# Altium PCB Anya_2620_V1_I1.PcbDoc (part 2 of 2)
Units mm, origin at the board's own origin, x right, y up, seen from the top; angles counter-clockwise.
Board outline 70 x 70 mm, 2 copper layers (Top Layer, Bottom Layer), stack 1.671 mm thick; 65 components, 38 nets, 247 pads, 122 vias.
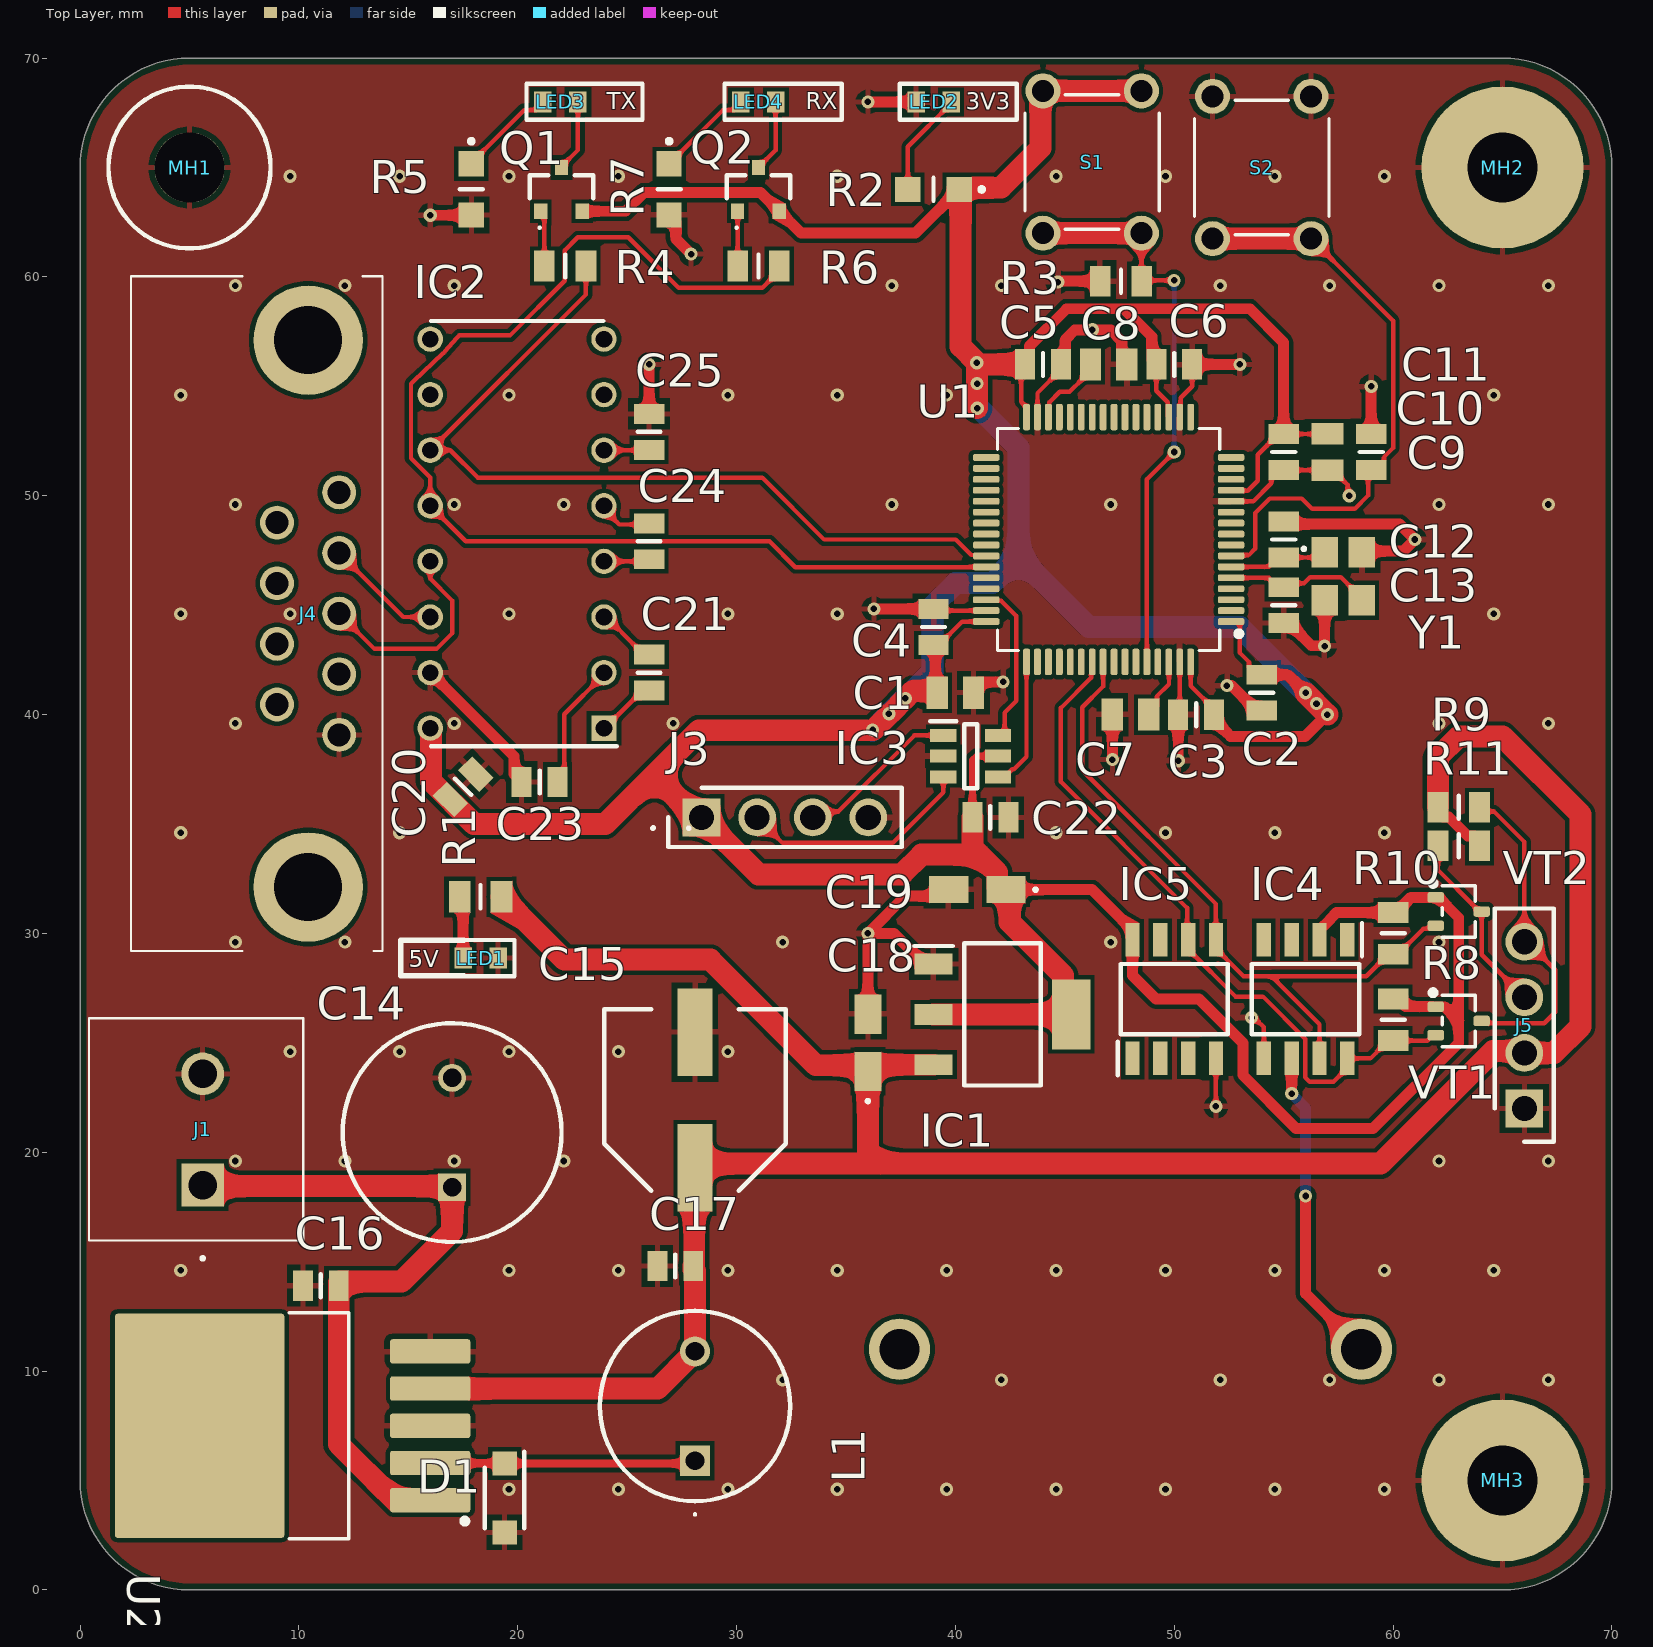
[diagram p0: Top Layer view]

## Polygon pours and split planes (outlines as drawn) (continued)
GND on Top Layer "GND_L01_P002" (solid, pour order 2): 0,70 0,0 70,0 70,70

## Silkscreen, mask and mechanical layers (free items; w line width, h text height)
Top Overlay:
  lines w0.2: 22.75,67.175 25.7,67.175 25.7,68.825 22.75,68.825 ; 31.85,67.175 34.8,67.175 34.8,68.825 31.85,68.825 ; 39.85,67.175 42.8,67.175 42.8,68.825 39.85,68.825
  lines w0.25: 17.532,28.072 14.652,28.072 14.652,29.688 17.537,29.688 ; 26.175,34.8 26.194,34.819 ; 27.81,34.815 27.825,34.8
  text "TX" at 24.069,67.669 h0.76
  text "RX" at 33.169,67.669 h0.76
  text "3V3" at 40.461,67.639 h0.76
  text "5V" at 15.021,28.447 h0.76
Bottom Overlay:
  lines w0.25: 26.939,34.008 37.404,34.008 ; 29.698,24.808 29.698,36.695 ; 32.239,24.808 32.239,36.708 ; 34.725,24.808 34.725,36.717 ; 55.5,21.5 55.5,31.1 67.4,31.1 67.4,20.585 59.115,20.585 ; 55.5,23.313 67.409,23.313 ; 55.5,25.8 67.4,25.8 ; 55.5,28.341 67.387,28.341 ; 64.7,20.634 64.7,31.1 ; 26.939,24.808 26.939,36.708 37.453,36.708 37.453,24.808 26.939,24.808
  text "+3V3" at 29.112,33.481 h0.76 r90
  text "SWDIO" at 31.585,33.481 h0.76 r90
  text "SWCLK" at 34.139,33.481 h0.76 r90
  text "GND" at 36.818,33.481 h0.76 r90
  text "LCD_I2C_SCL" at 64.173,29.054 h0.76
  text "LCD_I2C_SDA" at 64.173,26.513 h0.76
  text "+5V" at 64.173,23.9 h0.76
  text "GND" at 64.173,21.386 h0.76
Mechanical 1:
  the board outline again, w0.254